# Altium PCB sheet4.PcbDoc (part 2 of 2)
Units mm, origin at the board's own origin, x right, y up, seen from the top; angles counter-clockwise.
Board outline 48.25 x 36 mm, 2 copper layers (Top Layer, Bottom Layer); 88 components, 96 nets, 433 pads, 91 vias.
Unrouted connection lines stored in the file: 251.
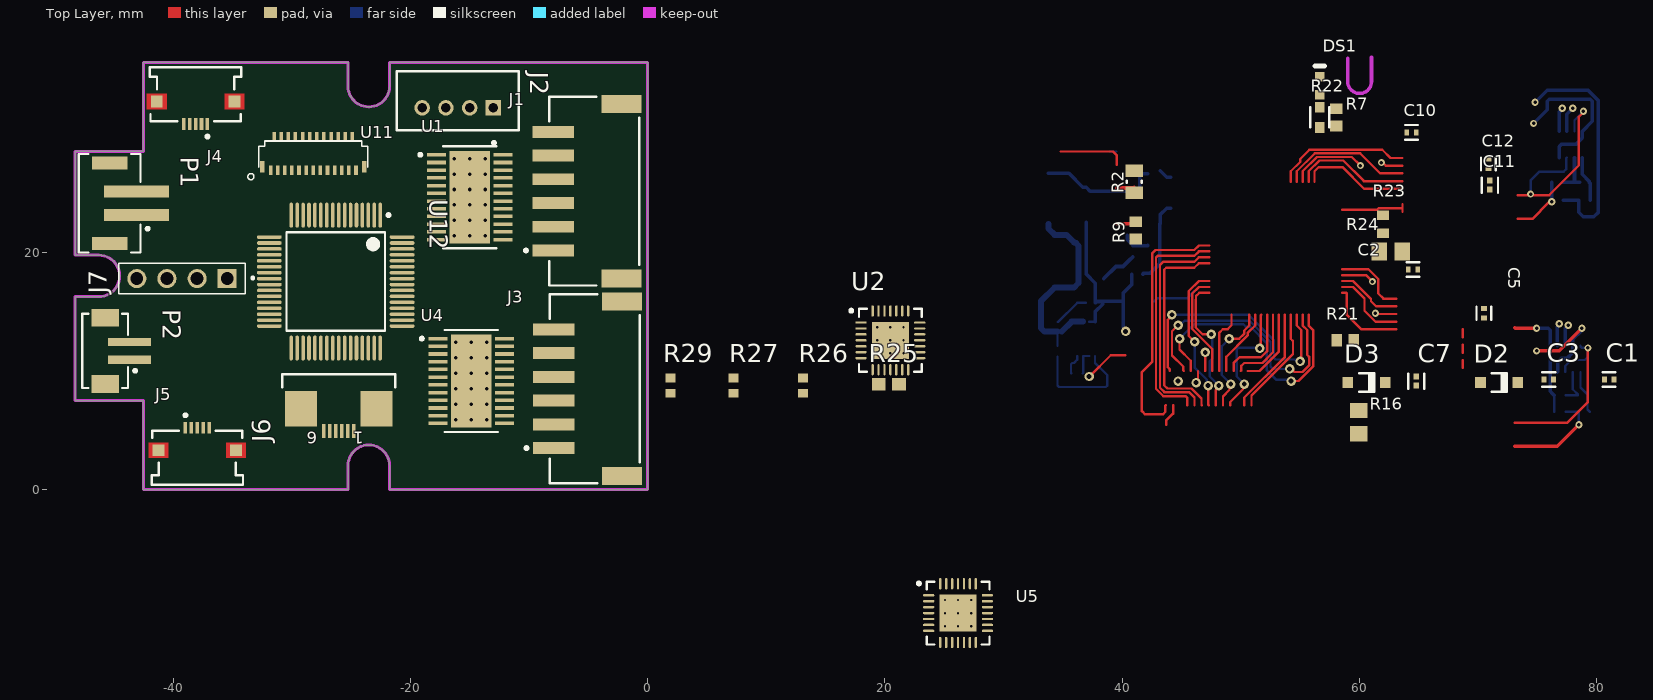
[diagram p0: Top Layer view]

## Via types
v1: diameter 0.6, hole 0.3, Top Layer to Bottom Layer, 54 vias
v2: diameter 0.8, hole 0.4, Top Layer to Bottom Layer, 19 vias
v3: diameter 0.5, hole 0.2, Top Layer to Bottom Layer, 18 vias

## Nets (pads, with @x,y where several pads share a name; then routed paths per layer and width w, separated by ;. In a path a pad name is that pad's centre, name@x,y a point inside that pad or via, vN(x,y) a via of type N, cw(c..) or ccw(c..) an arc to the next point about the centre after c; other vN are vias at no path point) (continued)
NetC17_1: (continued)
  Bottom Layer w0.3: D4.A 35.509,26.651 36.681,25.479 L2.2 37.29,25.146 41.312,25.146 41.488,25.322 U8.8 42.167,26.612 ; C17.1@43.203,26.869 43.753,26.319 C17.1
NetC17_2: C17.2 R15.1 U8.3
NetC19_1: C19.1 R24.2 U9.2
NetC19_2: C19.2 R20.2 U9.1
NetC25_1: C25.1 U12.5 Y1.2
NetC26_1: C26.1 U12.6 Y1.1
NetC27_2: C27.2 U12.3 Y2.2
NetC28_2: C28.2 U12.4 Y2.1
NetD1_A: D1.A L1.2 U3.1
NetD2_1: D2.1 U2.26
NetD2_2: D2.2 R4.2
NetD3_1: D3.1 U2.25
NetD3_2: D3.2 R5.2
NetDS1_1: DS1.1 R25.1
NetP2_1: P2.1 R18.1
NetP2_2: P2.2 Q1.3
NetQ1_1: Q1.1 R23.2
NetR1_1: R1.1 R3.2 U3.3
NetR2_2: R2.2 U2.9
NetR6_1: R6.1 U2.11
NetR7_2: R7.2 U1.10
NetR8_2: R8.2 U4.12
NetR9_2: R9.2 U4.10 | length 1.6
  Top Layer w0.3: 39.551,22.411 41.056,22.411 R9.2@41.148,22.319
NetR10_2: R10.2 U1.12
NetR11_1: R11.1 U6.7 | length 9.6
  Bottom Layer w0.2: R11.1 34.544,8.763 34.671,8.636 38.618,8.636 38.735,8.753 38.735,9.652 37.711,10.676 U6.7
NetR12_2: R12.2 U6.10
NetR19_1: R19.1 R21.2 U8.4
NetR27_1: R27.1 U12.60
NetR28_1: R28.1 U12.7
nFault_DRV: U4.2 U12.37 | length 6.3
  Top Layer w0.2: 58.559,18.57 60.75,18.57 61.587,17.733 61.587,16.518 62.013,16.092 63.107,16.092
nFault_DRV2: U1.2 U12.54 | length 11.5
  Top Layer w0.2: 54.209,25.92 54.209,26.82 55.002,27.613 55.002,27.859 55.775,28.632 61.919,28.632 62.607,27.944 63.621,27.944
nSCS_DRV: U4.6 U12.33 | length 6.9
  Top Layer w0.2: 58.559,16.57 58.894,16.57 58.94,16.524 58.94,14.72 60.168,13.492 63.107,13.492
nSCS_DRV2: U1.6 U12.50 | length 9.2
  Top Layer w0.2: 56.209,25.92 56.209,26.82 56.559,27.17 58.555,27.17 60.381,25.344 63.621,25.344
PE1: U12.40
PE2: U12.59
PWM1: J1.6 R22.1 R24.1 U4.18 U4.19 | length 0.7
  Top Layer w0.2: 68.707,12.842 68.707,13.492
PWM2: J1.1 R20.1 R22.2 U4.14 U4.15 | length 0.7
  Top Layer w0.2: 68.707,10.242 68.707,10.892
PWM3: J3.1 R14.2 R16.1 U1.18 U1.19 | length 3.2
  Bottom Layer w0.3: 38.455,17.78 39.471,18.796 40.071,18.796 40.699,19.424 40.719,19.424 40.894,19.599 R14.2@40.894,19.624
PWM4: J3.6 R13.1 R14.1 U1.14 U1.15
RESET: U11.8 U12.30
RS: U11.9 U12.10
SCL_M: J4.2 J5.2 U7.5 U9.5 U12.57 | length 4
  Bottom Layer w0.3: U9.5 76.678,13.732 76.835,13.889 v1(76.835,13.97) ; U7.5 76.82,31.781 77.089,32.05 v1(77.089,32.131)
SCLK_DRV: U4.5 U12.34 | length 6.4
  Top Layer w0.2: 58.559,17.07 59.459,17.07 60.42,16.109 60.42,15.073 61.351,14.142 63.107,14.142
SCLK_DRV2: U1.5 U12.51 | length 9.9
  Top Layer w0.2: 55.709,25.92 55.709,26.82 56.618,27.729 58.631,27.729 60.366,25.994 63.621,25.994
SDA_M: J4.3 J5.3 U7.6 U9.6 U12.58 | length 4
  Bottom Layer w0.3: U9.6 77.328,13.574 v1(77.597,13.843) ; U7.6 77.47,31.623 v1(77.978,32.131)
SDI_DRV: U4.4 U12.36 | length 1.8
  Top Layer w0.2: v1(61.341,14.859) 61.408,14.792 63.107,14.792
SDI_DRV2: U1.4 U12.53 | length 11.1
  Top Layer w0.2: 54.709,25.92 54.709,26.82 56.221,28.332 60.06,28.332 61.748,26.644 63.621,26.644
SDO_DRV: U4.3 U12.35 | length 5.5
  Top Layer w0.2: 58.559,17.57 59.459,17.57 60.965,16.064 60.965,15.87 61.393,15.442 63.107,15.442
SDO_DRV2: U1.3 U12.52 | length 1.9
  Top Layer w0.2: v1(61.849,27.559) 61.957,27.559 62.222,27.294 63.621,27.294
USB_D+: J2.3 U2.4
USB_D-: J2.2 U2.5
Vout: C6.2 C14.2 C16.2 L1.1 L2.1 P1.1 R15.2 U3.4 U3.5 U6.3 U6.4 | length 17.3
  Bottom Layer w0.2: U6.3 U6.4
  Bottom Layer w0.3: L2.1 36.957,18.161 37.738,17.38 C14.2 37.763,15.723 37.763,15.823 37.788,15.848 38.327,15.848 38.354,15.875 ; U6.4 37.711,14.978 38.354,15.621 38.354,15.875 ; v2(40.28,13.319) 40.28,13.454 40.102,13.632 C16.2 ; R15.2 40.8,17.273 40.102,16.575 C16.2 ; 38.354,15.875 C16.2
XL: U11.24 U12.25
XR: U11.22 U12.24
YD: U11.23 U12.26
YU: U11.25 U12.27
pads on no net: C22.1 J1.MP1 J1.MP2 J3.MP1 J3.MP2 J4.MP1 J4.MP2 J5.MP1 J5.MP2 J6.1 J6.2 J6.3 J6.4 J6.5 J6.6 J6.MP1 J6.MP2 P1.MP1 P1.MP2 P2.MP1 P2.MP2 R17.1 R17.2 R26.2 U1.25 U2.1 U2.2 U2.10 U2.12 U2.13 U2.14 U2.15 U2.16 U2.17 U2.18 U2.19 U2.20 U2.21 U2.22 U2.23 U2.24 U2.27 U2.28 U3.6 U4.25 U5.1 U5.2 U5.3 U5.4 U5.5 U5.6 U5.7 U5.8 U5.9 U5.11 U5.12 U5.23 U5.24 U5.25 U5.26 U5.27 U5.28 U5.29 U6.5 U6.6 U6.11 U11.P1 U11.P2 U12.1 U12.2 U12.12 U12.13 U12.18 U12.19 U12.31 U12.32 U12.44 U12.47 U12.48 U12.63 U12.64
copper on no net: | length 360.6
  Top Layer w0.2: 34.801,28.486 38.971,28.486 39.228,28.486 39.551,28.163 39.551,27.361 ; 43.692,7.112 43.642,7.062 43.642,6.548 43.444,6.35 41.91,6.35 41.656,6.604 41.656,9.906 42.545,10.795 42.545,19.939 42.795,20.189 46.078,20.189 46.459,20.57 47.359,20.57 ; 43.699,5.456 43.699,5.806 44.292,6.399 44.292,7.112 ; 43.992,9.987 43.992,10.162 43.85,10.304 43.85,14.315 44.196,14.661 v2(44.196,14.732) ; v2(44.704,13.843) 44.196,13.335 44.196,11.303 45.142,10.357 45.142,10.037 45.192,9.987 ; v2(44.831,12.7) 44.831,11.811 45.783,10.859 45.783,9.996 45.792,9.987 ; 45.492,7.112 45.492,7.721 45.339,7.874 43.463,7.874 42.845,8.492 42.845,19.558 42.976,19.689 46.078,19.689 46.459,20.07 47.359,20.07 ; 46.092,7.112 46.092,7.756 45.639,8.209 43.552,8.209 43.18,8.581 43.18,18.923 43.446,19.189 46.078,19.189 46.459,19.57 47.359,19.57 ; v2(46.101,12.446) 45.593,12.954 45.593,16.704 46.459,17.57 47.359,17.57 ; v2(46.228,9.017) 46.392,9.181 46.392,9.987 ; 46.692,7.112 46.681,7.123 46.681,7.675 45.847,8.509 43.815,8.509 43.55,8.774 43.55,18.531 43.708,18.689 46.078,18.689 46.459,19.07 47.359,19.07 ; v2(47.233,8.763) 47.263,8.733 47.263,7.141 47.292,7.112 ; 47.359,16.57 46.486,16.57 46.221,16.305 46.221,16.03 46.193,16.002 46.193,13.667 46.779,13.081 v2(47.498,13.081) ; 47.359,17.07 46.459,17.07 45.893,16.504 45.893,13.543 47.592,11.844 47.592,9.987 ; 47.892,7.112 47.892,8.36 48.133,8.601 v2(48.133,8.763) ; 48.192,9.987 48.192,13.224 48.481,13.512 48.88,13.512 49.209,13.841 49.209,14.72 ; 48.492,7.112 48.492,7.852 49.045,8.405 49.045,8.786 v2(49.149,8.89) ; 48.792,9.987 48.768,10.011 48.768,11.176 50.571,12.979 50.571,13.182 51.209,13.82 51.209,14.72 ; v2(49.022,12.7) 49.852,12.7 50.271,13.119 50.271,13.382 50.709,13.82 50.709,14.72 ; 49.092,7.112 49.092,7.362 50.177,8.447 50.177,8.775 v2(50.292,8.89) ; 49.392,9.987 49.392,10.652 49.886,11.147 51.703,11.147 52.209,11.653 52.209,14.72 ; 49.992,9.987 50.042,10.037 50.042,10.428 50.282,10.668 51.816,10.668 52.71,11.562 52.71,14.719 52.709,14.72 ; 50.292,7.112 50.292,7.747 53.709,11.164 53.709,14.72 ; 50.592,9.987 51.559,9.987 53.209,11.637 53.209,14.72 ; 50.892,7.112 50.892,7.923 54.397,11.428 54.397,12.516 54.209,12.705 54.209,14.72 ; v2(51.597,11.89) 51.69,11.982 51.69,14.701 51.709,14.72 ; v2(54.102,10.16) 54.264,10.16 54.518,9.906 55.202,9.906 55.753,10.457 55.753,11.176 55.59,11.339 55.59,13.439 55.209,13.82 55.209,14.72 ; v2(54.229,9.144) 54.864,9.144 56.09,10.37 56.09,13.439 55.709,13.82 55.709,14.72 ; 54.709,14.72 54.709,13.82 55.09,13.439 55.09,10.894 v2(54.991,10.795) ; 55.209,25.92 55.209,26.82 56.418,28.029 59.347,28.029 v1(60.071,27.305) ; 58.559,18.07 60.543,18.07 v1(61.087,17.526) ; 58.559,23.57 61.479,23.57 61.628,23.719 63.621,23.719 ; 63.621,23.394 63.621,23.719 ; 63.621,24.044 63.621,23.719 ; 73.325,22.813 74.575,22.813 75.942,24.18 76.123,24.18 v1(76.2,24.257) ; 73.325,24.813 75.994,24.813 78.486,27.305 78.486,31.409 78.867,31.79 v1(78.867,31.877)
  Top Layer w0.3: 73.071,3.636 76.661,3.636 v1(78.486,5.461) ; 73.071,13.636 73.118,13.589 v1(74.93,13.589)
  Bottom Layer w0.2: 35.72,9.779 35.687,9.812 35.687,10.551 35.804,10.668 35.928,10.668 36.211,10.951 36.211,11.248 ; 38.971,28.486 39.521,28.486 ; v2(44.196,14.732) 50.633,14.732 52.797,12.568 52.797,11.074 52.914,10.957 54.574,10.957 54.621,10.91 54.876,10.91 v2(54.991,10.795) ; v2(44.704,13.843) 44.866,13.843 45.247,14.224 50.716,14.224 52.497,12.443 52.497,10.368 52.705,10.16 v2(54.102,10.16) ; v2(44.831,12.7) 46.055,13.924 50.211,13.924 50.419,13.716 50.8,13.716 52.197,12.319 52.197,10.033 52.971,9.259 54.114,9.259 v2(54.229,9.144) ; v2(46.101,12.446) 46.101,10.287 47.118,9.27 47.118,8.878 v2(47.233,8.763) ; v2(47.498,13.081) 47.59,12.989 47.59,11.038 47.371,10.819 47.371,9.525 v2(48.133,8.763) ; v2(49.022,12.7) 48.387,12.065 48.387,9.652 v2(49.149,8.89) ; v2(50.292,8.89) 49.657,9.525 49.657,11.811 49.784,11.938 51.549,11.938 v2(51.597,11.89) ; v1(74.422,24.892) 74.422,26.035 75.184,26.797 77.216,26.797 77.421,27.002 77.421,27.93 77.47,27.979 ; 76.416,6.561 76.416,7.958 ; 77.366,6.561 78.448,6.561 78.486,6.523 v1(78.486,5.461) ; 77.366,7.958 78.415,7.958 78.415,8.008 77.978,8.445 77.978,9.906 ; 78.12,30.18 78.12,31.13 v1(78.867,31.877) ; 78.628,9.906 78.628,8.595 79.215,8.008 79.215,7.958 79.215,6.744 79.398,6.561
  Bottom Layer w0.3: 40.427,21.422 40.427,21.055 40.708,20.774 40.719,20.774 40.894,20.599 40.894,20.574 40.91,20.558 42.148,20.558 42.164,20.541 42.164,20.566 ; 41.75,18.161 41.833,18.244 42.374,18.244 43.18,19.05 43.18,22.407 43.192,22.419 43.192,23.169 43.742,23.719 44.069,23.719 ; v1(74.803,32.639) 75.819,33.655 79.257,33.655 80.137,32.775 80.137,23.368 79.756,22.987 78.867,22.987 78.486,23.368 78.486,24.384 77.183,24.384 ; v1(74.93,13.589) 75.897,13.589 76.073,13.413 76.073,8.301 76.216,8.158 76.216,8.133 76.391,7.958 76.416,7.958 ; 76.2,25.908 76.216,25.892 76.216,24.4 v1@76.233,24.384 ; 77.15,25.908 78.105,25.908 ; 78.12,27.979 78.12,25.923 78.105,25.908 ; 78.575,25.908 78.105,25.908 ; 78.77,27.979 78.77,26.563 79.375,25.958 79.375,25.908 79.375,25.858 79.436,25.797 79.436,24.384
  other v1: -16.159,5.894 -14.859,5.894 -13.559,5.894 -16.159,7.194 -14.859,7.194 -13.559,7.194 -16.159,8.494 -14.859,8.494 -13.559,8.494 -16.159,9.794 -14.859,9.794 -13.559,9.794 -16.159,11.094 -14.859,11.094 -13.559,11.094 -16.159,12.394 -14.859,12.394 -13.559,12.394 -16.286,21.388 -14.986,21.388 -13.686,21.388 -16.286,22.688 -14.986,22.688 -13.686,22.688 -16.286,23.988 -14.986,23.988 -13.686,23.988 -16.286,25.288 -14.986,25.288 -13.686,25.288 -16.286,26.588 -14.986,26.588 -13.686,26.588 -16.286,27.888 -14.986,27.888 -13.686,27.888
  other v2: 44.704,9.144
  other v3: 25.062,-11.514 26.162,-11.514 27.262,-11.514 25.062,-10.414 26.162,-10.414 27.262,-10.414 25.062,-9.314 26.162,-9.314 27.262,-9.314

## Keep-outs
Keep-Out Layer:
  lines w0.254: -48.25,7.5 -48.25,16.25 -46.25,16.25 ccw(c-46.25,18) -46.25,19.75 -48.25,19.75 -48.25,28.5 -42.5,28.5 -42.5,36 -25.25,36 -25.25,34 ccw(c-23.5,34) -21.75,34 -21.75,36 0,36 0,0 -21.75,0 -21.75,2 ccw(c-23.5,2) -25.25,2 -25.25,0 -42.5,0 -42.5,7.5 -48.25,7.5
  lines w0.3: 59.012,36.365 59.012,34.381 ccw(c60.012,34.381) 61.012,34.381 61.012,36.449

## Silkscreen, mask and mechanical layers (free items; w line width, h text height)
Mechanical 15:
  lines w0.003: 6.365,8.233 6.365,8.233

## Text inside footprints (layer, text, board x,y; h text height)
J6: Top Overlay "6" at -27.835,4.883 h1.02 r180; Top Overlay "1" at -23.935,4.883 h1.02 r180